# Altium PCB ASCII-v1.2.PcbDoc (part 4 of 4)
Units mil, origin at the board's own origin, x right, y up, seen from the top; angles counter-clockwise.
Board outline 1968.5 x 4921.26 mil, 4 copper layers (Top Layer, Layer 1, Layer 2, Bottom Layer), stack 62.45 mil thick; 189 components, 115 nets, 824 pads, 260 vias.
Unrouted connection lines stored in the file: 139.
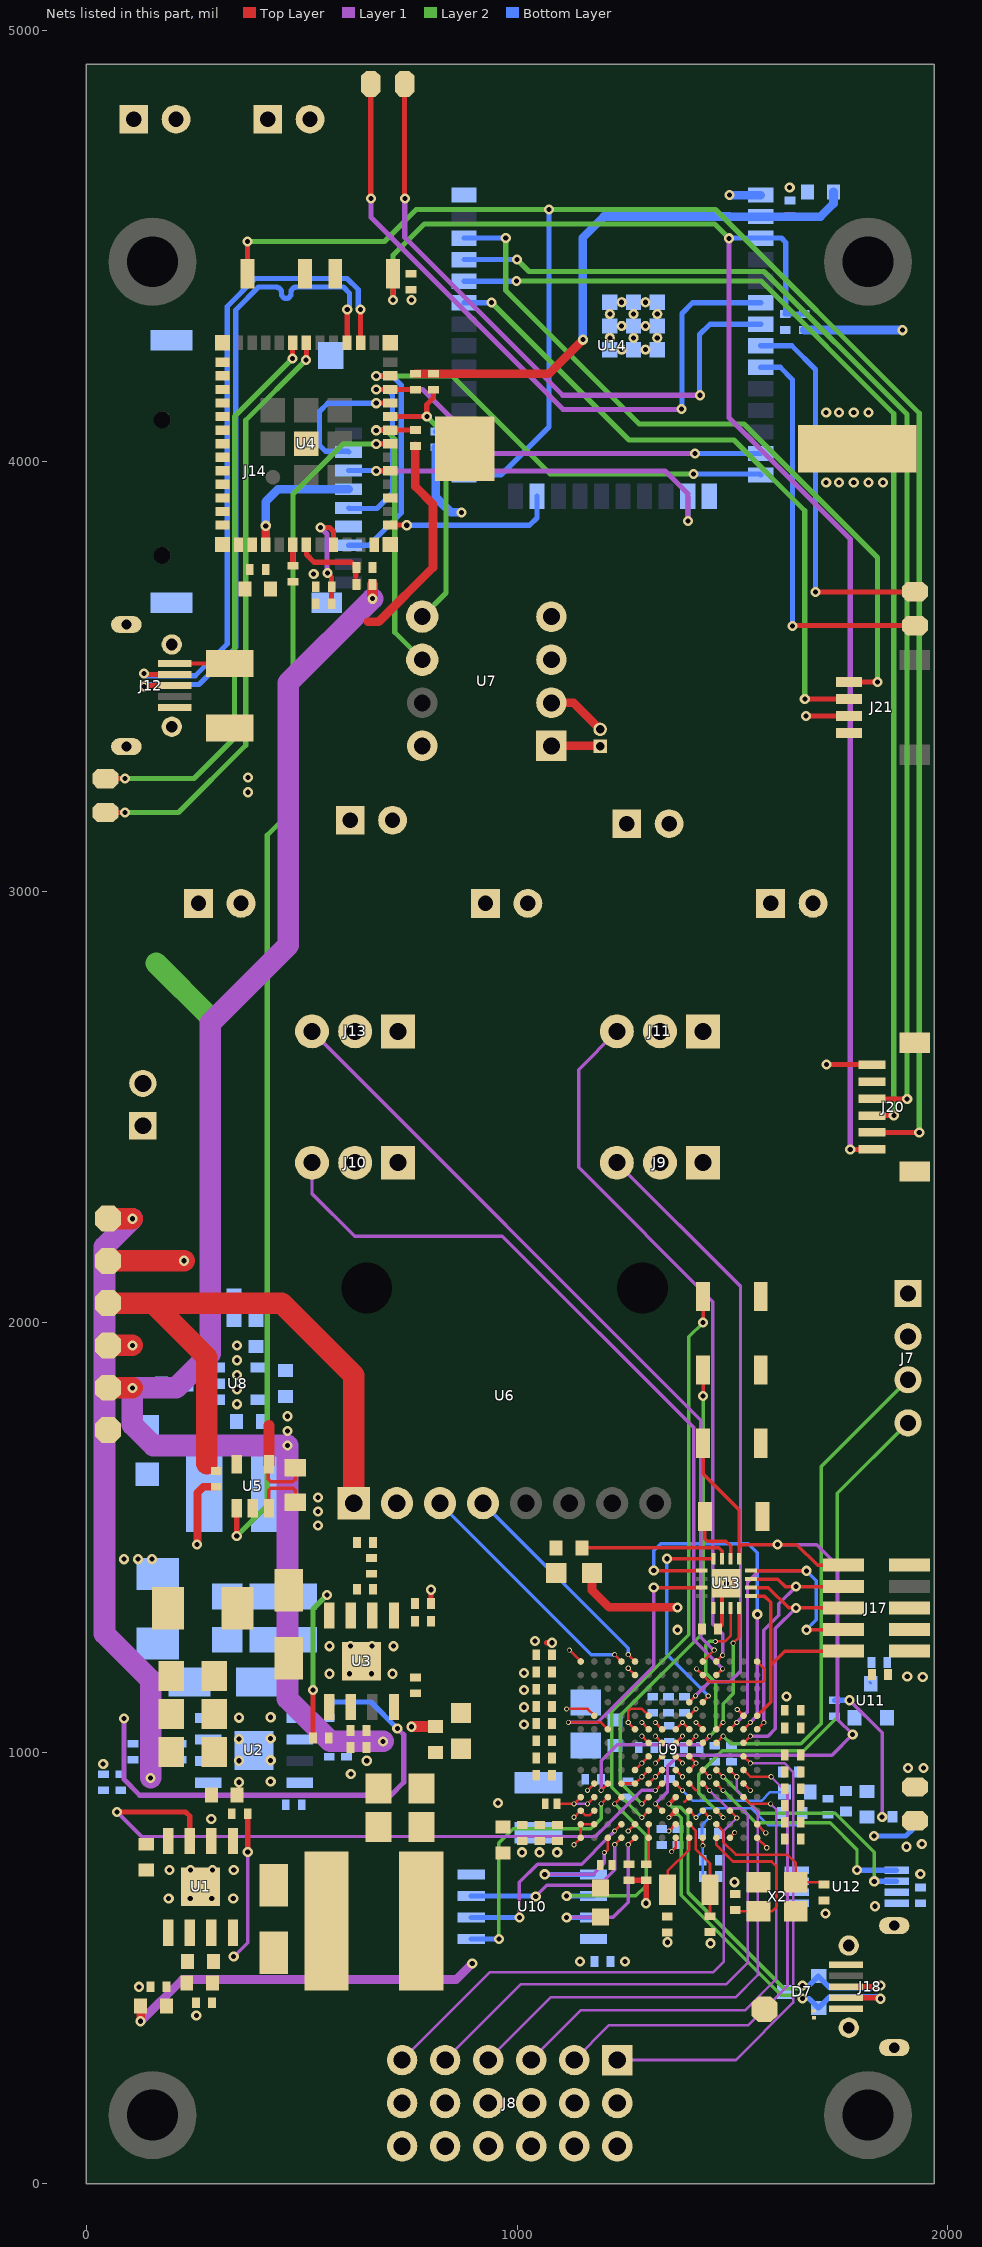
[diagram p4: the nets of this part, all layers, seen from the top]

## Via types
v1: diameter 23.62, hole 11.81, Top Layer to Bottom Layer, tented both sides, 169 vias
v2: diameter 11.81, hole 7.87, Top Layer to Bottom Layer, tented both sides, 78 vias
v3: diameter 23.62, hole 11.81, Top Layer to Bottom Layer, 13 vias

## Nets (pads, with @x,y where several pads share a name; then routed paths per layer and width w, separated by ;. In a path a pad name is that pad's centre, name@x,y a point inside that pad or via, vN(x,y) a via of type N, cw(c..) or ccw(c..) an arc to the next point about the centre after c; other vN are vias at no path point)
3V3: C4.2 C18.1 C19.1 C20.2 C23.2 C37.2 C38.2 C39.2 C40.2 C41.2 C42.2 C43.2 C44.2 C45.2 C46.2 C47.2 C48.2 C49.2 C50.2 C51.2 C52.2 C53.2 C54.2 C55.2 C60.2 C80.2 C81.1 C82.1 D8.1 FB2.1 J5.1 J14.4 J17.1 J19.1 J20.1 J21.2 L3.2 LED2.1 R12.1 R14.2 R15.2 R16.2 R17.2 R27.1 R29.1 R30.1 TP7.1 U4.3 U5.5 U6.1 U9.E6 U9.E9 U9.F5 U9.F10 U9.J6 U9.J10 U9.K4 U9.K5 U9.N14 U9.P12 U10.8 U11.3 U12.8 U13.1 U14.2 | length 5659.3
  Top Layer w6: U9.K4@1242.51,929.02 U9.K5@1274.01,929.02 ; U9.K5@1274.01,929.02 v2(1289.76,944.77) U9.J6@1305.5,960.52 ; U9.F5@1274.01,1055.01 v2(1258.26,1070.76) 1258.5,1071 1258.5,1097.01 1263.75,1102.25 1289.76,1102.25 U9.E6@1305.5,1086.5 ; U9.E9@1399.99,1086.5 v2(1415.74,1102.25) ; v2(1415.74,1070.76) U9.F10@1431.49,1055.01 ; U9.J10@1431.49,960.52 v2(1447.24,944.77) ; U9.P12@1494.48,803.04 1494.48,803.98 v2(1505.5,815.01) ; U9.N14@1557.47,834.54 v2(1577.5,814.5)
  Top Layer w12: 1069,1256 v1(1081,1256) ; v1@1621,1131 v1(1626,1131) ; v1(1671.13,3408.32) J21.2@1779.54,3408.32 ; v1(1718.7,2598.43) J20.1@1827.11,2598.43
  Top Layer w20: v1(126,377) R17.2@126,412 ; U4.3@416.39,3806.23 v1(416.39,3849.74) ; 653,3627 679,3627 805,3753 805,3900 764,3941 R15.2@764,4034.98 ; R14.2@764,4203 R16.2@806,4203 1074.02,4203.02 v1(1153,4282) ; LED2.1@1174,1418 1174,1378 1214,1338 v1(1373,1338)
  Top Layer w50: TP7.1@50,2044.6 106.6,2044.6 ; 107,2044.2 154.8,2044.2 ; 280,1672 280,1919 154.8,2044.2 ; U6.1@621,1580 621,1877 453.8,2044.2 154.8,2044.2
  Layer 1 w20: v1(126,377) 223,474 859,474 v1(896,511)
  Bottom Layer w6: U11.3@1819.5,1164.01 U11.3@1821.5,1162.01
  Bottom Layer w12: v1(1829,807) 1853.99,807.01 1902.5,807.01 1919.24,823.75 D8.1@1919.24,852.02
  Bottom Layer w20: v1(416.39,3849.74) 416.39,3906 444.97,3934.58 J14.4@609.07,3934.58 ; R30.1@811,4032 811,3916 846,3881 v1(871,3881) ; v1(1153,4282) 1153,4519 1202,4568 1493.74,4568 1493.92,4567.82 U14.2@1565.9,4567.82 1704.82,4567.82 1735,4598 C82.1@1735,4625 ; R29.1@1667,4304.5 1893.5,4304.5 1895,4303 v1(1895,4304)
  other v1: 1146,516 1831.5,644.01 956,884 1942.28,1176.29 1906.28,1177.29 1373,1286
3V3_ENABLE: U1.3 U9.K7 | length 1571.5
  Top Layer w6: v2(1321.25,913.28) U9.K7@1337,929.02
  Top Layer w12: v1(71,863) 230.23,863 240.11,853.12 U1.3@240.11,795.42
  Layer 1 w8: v1(71,863) 128,806 1182,806 1210.79,834.79 1289.28,913.28 v2(1321.25,913.28)
5V: C3.2 C15.2 C21.2 C22.2 D3.1 J1.1 J2.1 J4.1 J6.1 J8.2 J8.5 J8.8 J8.11 J8.14 J8.17 J11.1 J13.1 L2.2 R6.2 TP6.1 U1.2 U7.8 | length 1458.4
  Top Layer w12: R6.2@800,1347 v1(800,1379)
  Top Layer w50: TP6.1@50,2241 v1@106.6,2241
  Layer 1 w50: v1(107,2240.6) 42,2175.6 42,1277 149,1170 v1(149,942)
  other v1: 290,847 375,3231 375,3265
8V4: C7.2 C8.2 C9.2 C13.2 C14.2 J3.1 J4.2 J9.1 J10.1 L1.2 R1.2 R2.2 TP5.1 U3.2 | length 232.7
  Top Layer w25: v1@755.34,1061.34 R1.2@811,1061.34
  Top Layer w50: TP5.1@50,2142.8 v1@227,2142.8
  other v1: 614,951 38.97,974.73 755,1061 87,1450 119.5,1450 152,1450 227,2143
12V: C27.2 C28.2 D5.2 J16.1 R21.2 TP3.1 | length 233.4
  Top Layer w50: TP3.1@50,1946.4 v1@106.6,1946.4
  Layer 2 w50: 162,2834 287,2709
  other v1: 107,1946
A10: J13.3 U9.A10 | length 1861.8
  Top Layer w6: U9.A10@1431.76,1212.49 1458,1238.73 v2(1458.01,1239)
  Layer 1 w8: J13.3@523.92,2675.7 1427,1772.62 1427,1268.67 1453.58,1242.09 1453.89,1242.09 1456.98,1239 v2(1458.01,1239)
A11: J11.3 U9.A11 | length 1644.6
  Top Layer w6: U9.A11@1462.98,1212.49 v2(1477.49,1226.99)
  Layer 1 w8: J11.3@1231.91,2675.7 1143,2586.79 1143,2360 1454.81,2048.19 1454.81,1989.88 1454.81,1838.45 1454.81,1819.55 1454.81,1299.17 1477.49,1276.49 v2(1477.49,1226.99)
B11: J10.3 U9.B11 | length 1791.6
  Top Layer w6: U9.B11@1462.98,1180.99 v2(1477.49,1195.5)
  Layer 1 w8: J10.3@523.92,2370.7 523.92,2299.08 623,2200 966,2200 1410.09,1755.91 1410.09,1262.89 1443,1229.98 v2(1477.49,1195.5)
CS: J14.2 U4.21 | length 326.4
  Top Layer w12: v1@672,4134.97 U4.21@705.76,4134.97
  Bottom Layer w12: J14.2@609.07,4021.19 607.26,4023 555,4023 541,4037 541,4115 560.48,4134.48 v1(673,4134.48)
CS1: U4.12 U14.23 | length 398.2
  Top Layer w12: U4.12@705.76,3851.5 743.5,3851.5 v1(744,3851)
  Bottom Layer w12: v1(744,3851) 1029,3851 1046.21,3868.21 U14.23@1046.21,3918.61
CUR_SENSE: U4.18 U5.1 | length 2812.7
  Top Layer w12: v1(349.1,1503.81) U5.1@349.1,1568.32 ; v1@673,4040.48 U4.18@705.76,4040.48
  Layer 2 w12: v1(349.1,1503.81) 420,1574.71 420,3131 479.63,3190.63 479.63,3923.63 595.99,4039.99 v1(673,4039.99)
D9: J9.3 U9.D9 | length 1448.4
  Top Layer w6: U9.D9@1399.99,1118 v2(1414.5,1132.5)
  Layer 1 w8: J9.3@1231.91,2370.7 1518.91,2083.71 1518.91,1189.91 1494,1165 1446.99,1165 v2(1414.5,1132.5)
D10: U9.D10 U13.12 | length 486.7
  Top Layer w6: U9.D10@1431.49,1118 1431.49,1118.88 1444.09,1131.49 v2(1444.09,1132.37)
  Top Layer w8: v1(1348,1451) 1348.09,1451.09 U13.12@1456.47,1451.09
  Bottom Layer w8: v1@1347.69,1451 1347.69,1229.28 1444.09,1132.87 v2(1444.09,1132.37)
EN: C26.2 R27.2 U4.8 | length 250.8
  Top Layer w12: v1(544,3846) 564.34,3846 573.87,3836.47 U4.8@573.87,3806.23 ; v1(559.58,3740.42) 569.5,3730.5 R27.2@569.5,3669
  Layer 1 w12: v1(544,3846) 559,3831 v1@559,3741
EN_1: C83.2 C84.2 J20.6 R29.2 SW6.1 U14.3 | length 3619.4
  Top Layer w12: SW6.1@711.67,4435 711.67,4374.33 v1(712,4374) ; v1(1773.91,2401.57) J20.6@1824.3,2401.57
  Layer 1 w12: v1(1492.15,4517.41) 1492.15,4100.85 1773.91,3819.09 v1(1773.91,2401.57)
  Layer 2 w12: v1(712,4374) 712,4478 785,4551 1458.56,4551 v1(1492.15,4517.41)
  Bottom Layer w12: v1(1492.15,4517.41) 1492.56,4517.82 U14.3@1565.9,4517.82 1614.18,4517.82 1624,4508 1624,4342.5 C83.2@1623,4341.5 R29.2@1667,4341.5
F3: U9.F3 U13.15 | length 644.7
  Top Layer w6: v2(1119.41,1071.01) 1195.02,1071.01 U9.F3@1211.02,1055.01
  Top Layer w8: v1(1317.53,1384.16) U13.15@1428.91,1384.16
  Layer 1 w8: v2(1119.41,1071.01) 1187.5,1071.01 1317.53,1201.03 v1(1317.53,1384.16)
F11: U9.F11 U13.4 | length 303.8
  Top Layer w6: U9.F11@1462.98,1055.01 v2(1478.73,1070.76) ; v2(1502,1255) 1515.53,1268.53 U13.4@1515.53,1336.91
  Layer 2 w8: v2(1478.73,1070.76) 1478.73,1114.73 1502.12,1138.12 1502.12,1254.88 v2(1502,1255)
F13: U9.F13 U13.13 | length 836.8
  Top Layer w6: U9.F13@1525.98,1055.01 v2(1541.72,1070.76)
  Top Layer w8: v1(1317.53,1423.53) U13.13@1428.91,1423.53
  Layer 1 w8: v2(1541.72,1070.76) 1558.22,1087.25 1558.22,1321.78 v1(1558,1322)
  Bottom Layer w8: v1(1317.53,1423.53) 1317.53,1469.53 1334,1486 1537,1486 1558,1465 v1(1558,1322)
G11: J7.3 U9.G11 | length 1159.1
  Top Layer w6: U9.G11@1462.98,1023.51 v2(1478.73,1039.26)
  Layer 2 w8: v2(1478.73,1039.26) 1496.98,1021.01 1659.37,1021.01 1707,1068.64 1707,1665.78 J7.3@1907.92,1866.7
GND: C3.1 C4.1 C5.1 C6.1 C7.1 C8.1 C9.1 C10.1 C11.1 C13.1 C14.1 C15.1 C16.1 C17.1 C18.2 C19.2 C20.1 C21.1 C22.1 C23.1 C24.1 C25.1 C26.1 C27.1 C29.1 C30.1 C31.1 C32.1 C33.1 C34.1 C35.1 C36.1 C37.1 C38.1 C39.1 C40.1 C41.1 C42.1 C43.1 C44.1 C45.1 C46.1 C47.1 C48.1 C49.1 C50.1 C51.1 C52.1 C53.1 C54.1 C55.1 C56.1 C57.1 C58.1 C59.1 C60.1 C61.1 C62.1 C63.1 C64.1 C65.1 C66.1 C67.1 C68.1 C69.1 C70.1 C71.1 C72.2 C73.2 C74.1 C75.1 C76.2 C77.2 C78.1 C79.1 C80.1 C81.2 C82.2 C83.1 C84.1 D1.2 D2.2 D4.2 D6.1 D7.3 J1.2 J2.2 J3.2 J5.2 J6.2 J7.2 J8.3 J8.6 J8.9 J8.12 J8.15 J8.18 J9.2 J10.2 J11.2 J12.5 J12.S1 J12.S2 J12.S3 J12.S4 J13.2 J14.6 J14.MP1 J14.MP2 J14.MP3 J14.MP4 J15.1 J16.2 J17.3 J17.5 J17.9 J18.5 J18.S1 J18.S2 J18.S3 J18.S4 J19.2 J20.2 J20.MP1 J20.MP2 J21.1 LED1.2 R4.1 R5.1 R8.1 R9.1 R13.1 R19.1 R20.1 R22.1 R24.1 SW1.2 SW2.2 SW3.2 SW4.1 SW5.2 SW6.2 TP2.2 TP8.1 U1.7 U1.9 U2.7 U2.9 U3.7 U3.9 U4.1 U4.2 U4.11 U4.14 U4.36 U4.37 U4.38 U4.39 U4.40 U4.41 U4.42 U4.43 U4.44 U4.45 U4.46 U4.47 U4.48 U4.49 U4.50 U4.51 U4.52 U4.53 U5.2 U6.2 U7.4 U8.2 U9.A1 U9.A14 U9.B5 U9.B10 U9.E2 U9.E13 U9.G7 U9.G8 U9.H7 U9.H8 U9.J7 U9.J8 U9.K2 U9.K6 U9.K9 U9.K13 U9.L9 U9.N1 U9.N2 U9.N5 U9.N8 U9.P1 U9.P14 U10.4 U11.1 U12.1 U12.2 U12.3 U12.4 U12.7 U13.2 U13.17 U14.1 U14.15 U14.38 U14.39 U14.39_10 U14.39_11 U14.39_12 U14.39_13 U14.39_14 U14.39_15 U14.39_16 U14.39_17 U14.39_18 U14.39_19 U14.39_20 U14.39_21 U14.40 U14.41 U14.42 U14.43 U14.44 U14.45 U14.46 U14.47 X2.2 X2.4 | length 1224.4
  Top Layer w6: v2(1115.35,1102.25) 1163.77,1102.25 U9.E2@1179.52,1086.5 ; v2(1121.64,1238.88) U9.A1@1148.02,1212.49 ; v2(1132.28,786.98) 1132.28,787.13 1148.02,802.88 U9.P1@1148.02,803.04 U9.N1@1148.02,834.54 U9.N2@1179.52,834.54 ; v2(1163.77,913.28) U9.K2@1179.52,929.02 ; v2(1258.26,818.79) U9.N5@1274.01,834.54 ; v2(1258.26,1196.74) U9.B5@1274.01,1180.99 ; U9.K6@1305.5,929.02 v2(1321.25,944.77) U9.J7@1337,960.52 ; v2(1321.25,976.27) U9.H7@1337,992.02 ; v2(1321.25,1039.26) U9.G7@1337,1023.51 ; v2(1352.75,818.79) U9.N8@1368.5,834.54 ; U9.J8@1368.5,960.52 v2(1384.24,944.77) ; U9.H8@1368.5,992.02 v2(1384.24,976.27) ; U9.G8@1368.5,1023.51 v2(1384.24,1039.26) ; 1388.76,886.28 U9.L9@1399.99,897.53 ; U9.K9@1399.99,929.02 1415.74,913.28 ; v2(1416.98,1195.5) U9.B10@1431.49,1180.99 1447.48,1165 1571,1165 1575,1169 1575,1194.96 U9.A14@1557.47,1212.49 ; v2(1511.47,1101.01) U9.E13@1525.98,1086.5 ; U9.K13@1525.98,929.02 v2(1541.72,913.28) ; U9.P14@1557.47,803.04 v2@1580.3,780.21
  Top Layer w10: C80.1@1466.5,1288 1476.16,1297.66 U13.2@1476.16,1336.91 1476.16,1384.16 v1(1486,1394)
  Top Layer w12: C30.1@1260,704.52 C31.1@1300,704.52 1300,651.5 v1(1299.5,651.01)
  Top Layer w18: v1(257,1484) 258,1485 258,1604.1 271.9,1618 C20.1@301.5,1618
  Bottom Layer w20: v1@1493.92,4617.82 U14.1@1565.9,4617.82
  other v1: 255.28,390.29 122,457 1251,516 1449,558 1349.37,560.37 1716.5,627.01 191.11,662.12 241.11,662.12 291.11,662.12 341.11,662.12 1505,700 1936.5,719.01 193.11,728.12 242.11,728.12 293.11,728.12 342.11,728.12 1011.28,769.29 1052.28,769.29 1093.28,769.29 1904.48,782.28 1940,788.26 354,932 428,934 354,982 651,982 428,983 354,1032 428,1034 1016,1066.21 354,1082 428,1083 1016,1106.14 1016,1146.07 564.81,1184 611,1184 662,1184 711,1184 1016,1186 564.81,1248 613,1248 663,1248 713,1248 1042,1260 350,1946 527.81,3738 755,4374 1493.74,4618 1633.17,4635.09
  other v2: 1580,779.91
  other v3: 350,1810 350,1844 350,1878 350,1912 1717.94,3950.69 1748,3950.69 1782,3950.69 1816,3950.69 1850,3950.69 1717.94,4112.69 1748,4112.69 1782,4112.69 1816,4112.69
H13: J8.1 U9.H13 | length 1129.2
  Top Layer w6: U9.H13@1525.98,992.02 v2(1541.72,976.27)
  Layer 1 w6: J8.1@1233,287 1508,287 1641.19,420.19 1641.19,955.81 1620.73,976.27 v2(1541.72,976.27)
IO0: J20.5 SW5.1 U14.25 | length 4394.4
  Top Layer w12: SW5.1@373.81,4435 373.81,4509.81 v1(374,4510) ; J20.5@1824.3,2440.94 1919.94,2440.94 1920,2441 v1(1934,2441) v1@1939,2441
  Layer 2 w12: v1(374,4510) 692,4510 766,4584 v1(1074,4584) 1461,4584 1934,4111 v1(1934,2441)
  Bottom Layer w12: U14.25@876.92,3967.82 962.56,3967.82 1074,4079.26 v1(1074,4584)
J11: U6.3 U9.A4 | length 573.7
  Top Layer w6: v2(1226.76,1228.24) U9.A4@1242.51,1212.49
  Bottom Layer w8: U6.3@821,1580 1172.76,1228.24 v2(1226.76,1228.24)
J12: J8.10 U9.J12 | length 1210.8
  Top Layer w6: U9.J12@1494.48,960.52 v2(1510.23,944.77)
  Layer 1 w6: J8.10@933,287 1079,433 1508,433 1559,484 1559,864.5 1510.23,913.28 v2(1510.23,944.77)
J13: J8.4 U9.J13 | length 1138.5
  Top Layer w6: U9.J13@1525.98,960.52 1541.72,944.77 v2(1590.15,944.77)
  Layer 1 w6: J8.4@1133,287 1214,368 1537,368 1628.19,459.19 1628.19,906.73 v2(1590.15,944.77)
JTAG_TCK/SWD_CLK: J17.4 U9.F12 U13.8 | length 876.9
  Top Layer w6: U9.F12@1494.48,1055.01 v2(1510.23,1070.76)
  Top Layer w8: U13.8@1543.09,1423.53 v1@1672,1423.53 ; v1@1672,1286.51 J17.4@1757.96,1286.51
  Layer 1 w8: v2(1510.23,1070.76) 1535.19,1095.72 1535.19,1396.19 1562,1423 v1(1672,1423)
  Bottom Layer w8: v1(1672,1286) 1695,1309 1695,1400 v1(1672,1423)
JTAG_TDI: J17.8 U9.F14 U13.7 | length 591.4
  Top Layer w6: U9.F14@1557.47,1055.01 v2@1573.22,1070.76 ; v2(1573.22,1070.6) v2@1573.38,1070.76
  Top Layer w8: U13.7@1543.09,1403.84 1605.16,1403.84 1622.49,1386.51 v1(1648,1386.51) J17.8@1757.96,1386.51
  Layer 1 w8: v2(1573.22,1070.6) 1573.22,1285.22 1607.67,1319.67 1607.67,1346.18 v1(1648,1386.51)
JTAG_TDO: J17.6 U9.G13 U13.6 | length 621.8
  Top Layer w6: U9.G13@1525.98,1023.51 v2(1541.72,1039.26)
  Top Layer w8: U13.6@1543.09,1384.16 1583.84,1384.16 1631,1337 v1(1648,1337) ; v1@1648.25,1337.25 1648.49,1337 J17.6@1757.47,1337
  Layer 1 w8: v2(1541.72,1039.26) 1582.76,1039.26 1600,1056.5 1600,1289 v1(1648,1337)
JTAG_TMS/SWD_IO: J17.2 U9.E14 U13.5 | length 510.9
  Top Layer w8: U13.5@1543.09,1364.47 1574.53,1364.47 1589,1350 1589,1204 ; U9.E14@1557.47,1086.5 1589,1118.03 1589,1204 ; J17.2@1757.96,1236.51 1621.51,1236.51 1589,1204
K3: R24.2 U9.G10 U9.K3 U13.3 | length 773.4
  Top Layer w6: v2(1195.27,913.28) U9.K3@1211.02,929.02 ; U9.G10@1431.49,1023.51 v2(1447.24,1039.26) ; v2(1460.58,1259) 1483,1259 1495.84,1271.84 U13.3@1495.84,1336.91
  Layer 1 w8: v2(1195.27,913.28) 1195.27,981.77 1232.5,1019.01 1426.98,1019.01 v2(1447.24,1039.26)
  Layer 2 w8: v2(1447.24,1039.26) 1461,1053.02 1461,1163 1438.36,1185.64 1438.36,1250.36 1447,1259 v2(1460.58,1259)
  Bottom Layer w6: v2(1195.27,913.28) R24.2@1195.27,939.02 R24.2@1196.5,939.02
K10: J8.13 U9.K10 | length 1274.4
  Top Layer w6: U9.K10@1431.49,929.02 v2(1447.24,913.28)
  Layer 1 w6: J8.13@833,287 1009,463 1486,463 1536,513 1536,856.01 1520,872.01 1488.5,872.01 v2(1447.24,913.28)
K11: U6.4 U9.A5 | length 513.7
  Top Layer w6: v2(1258.26,1228.24) U9.A5@1274.01,1212.49
  Bottom Layer w8: U6.4@921,1580 1258.26,1242.74 v2(1258.26,1228.24)
L13: J8.7 U9.L13 | length 1130
  Top Layer w6: U9.L13@1525.98,897.53 1541.72,881.78 v2(1588.97,881.78) v2@1590.15,881.78
  Layer 1 w6: J8.7@1033,287 1149,403 1530.37,403 1602,474.63 1602,868.75 v2(1588.97,881.78)
M11: J7.4 U9.M11 | length 1274.2
  Top Layer w6: U9.M11@1462.98,866.03 v2(1478.73,850.28)
  Layer 2 w8: v2(1478.73,850.28) 1422,907.02 1422,950 1477,1005 1666,1005 1744,1083 1744,1602.78 J7.4@1907.92,1766.7
M12: J8.16 U9.M12 | length 1210.5
  Top Layer w6: U9.M12@1494.48,866.03 v2@1510.23,850.28 ; v2(1510.23,849.1) v2@1510.34,849.21
  Layer 1 w6: J8.16@733,287 937,491 1456,491 1480,515 1480,818.87 v2(1510.23,849.1)
MISO: J14.7 U4.23 U14.14 | length 1538.9
  Top Layer w12: v1@672,4197.96 U4.23@705.76,4197.96
  Layer 2 w12: v1(673,4197.47) 849.53,4197.47 1077,3970 v1(1410,3970)
  Bottom Layer w12: J14.7@609.07,3804.66 656.5,3804.66 731,3879.16 731,4177 710.53,4197.47 v1(673,4197.47) ; v1(1410,3970) 1563.72,3970 U14.14@1565.9,3967.82
MOSI: J14.3 U4.16 U14.16 | length 964.7
  Top Layer w12: v1@672,3977.49 U4.16@705.76,3977.49
  Layer 1 w12: v1(673,3977) 1344,3977 1396.74,3924.26 v1(1396.74,3861)
  Bottom Layer w12: J14.3@609.07,3977.89 672.11,3977.89 v1(673,3977) ; U14.16@1396.21,3918.61 1396.74,3918.08 v1(1396.74,3861)
NetC1_1: C1.1 D4.1 L3.1 U1.8 | length 345.6
  Top Layer w12: v1(374.61,769.93) C1.1@374.61,859.12
  Layer 1 w8: v1(342,527) 374.61,559.61 v1(374.61,769.93)
NetC1_2: C1.2 U1.1
NetC2_1: C2.1 D1.1 L1.1 U2.8 | length 1133.6
  Layer 1 w12: v1(87,1080) 87,939 124,902 707,902 737,932 737,1042.19 v1(722,1057.19)
  Bottom Layer w12: C2.1@564,1118.5 660.69,1118.5 v1(722,1057.19)
NetC2_2: C2.2 U2.1
NetC10_2: C10.2 R3.1 U2.6
NetC11_2: C11.2 R3.2
NetC12_1: C12.1 D2.1 L2.1 U3.8 | length 345.6
  Top Layer w12: C12.1@526,1035 v1(526,1146.19)
  Layer 2 w12: v1(526,1146.19) 526,1334.19 v1(558.81,1367)
NetC12_2: C12.2 U3.1
NetC16_2: C16.2 R7.2 U3.6
NetC17_2: C17.2 R7.1
NetC24_2: C24.2 R18.2 U1.6
NetC25_2: C25.2 R18.1
NetC28_1: C28.1 R21.1 R22.2 U8.3
NetC30_2: C30.2 C31.2 FB1.2 U9.N6 U9.P6 | length 95.3
  Top Layer w6: C31.2@1300,741.52 1305.5,747.02 U9.P6@1305.5,803.04 U9.N6@1305.5,834.54
NetC32_2: C32.2 C33.2 U9.P8 | length 36
  Top Layer w6: v2(1359,771.02) 1368.5,780.51 U9.P8@1368.5,803.04
NetC34_2: C34.2 C35.2 U9.P10 | length 91.1
  Top Layer w6: U9.P10@1431.49,803.04 v2(1431.5,785.01) v2@1432.59,785.01
  Bottom Layer w6: C35.2@1431.5,713.01 C34.2@1431.5,751.01 v2(1431.5,785.01)
NetC36_2: C36.2 U9.M10 | length 76.9
  Top Layer w6: U9.M10@1431.49,866.03 v2(1447.24,850.28)
  Bottom Layer w6: C36.2@1429.5,803.03 C36.2@1429.5,813.01 1429.5,832.55 v2(1447.24,850.28)
NetC56_2: C56.2 C57.2 C58.2 C59.2 FB2.2 U9.L1 U9.L2 | length 115.4
  Top Layer w6: FB2.2@1093,882.02 1093.24,881.78 v2(1132.28,881.78) U9.L1@1148.02,897.53 ; v2(1163.77,881.78) U9.L2@1179.52,897.53
  Layer 1 w6: v2(1132.28,881.78) v2(1163.77,881.78)
NetC61_2: C61.2 C62.2 C63.2 C64.2 C65.2 C66.2 C67.2 C68.2 C69.2 C70.2 C71.2 C74.2 L5.1 U9.F6 U9.F7 U9.F8 U9.F9 U9.G6 U9.G9 U9.H6 U9.H9 U9.J5 U9.J9 | length 222.7
  Top Layer w6: U9.J5@1274.01,960.52 v2(1289.76,976.27) U9.H6@1305.5,992.02 ; v2(1289.76,1039.26) U9.G6@1305.5,1023.51 ; v2(1289.76,1070.76) U9.F6@1305.5,1055.01 ; v2(1321.25,1070.76) U9.F7@1337,1055.01 ; U9.F8@1368.5,1055.01 v2(1384.24,1070.76) U9.F9@1399.99,1055.01 ; U9.J9@1399.99,960.52 v2(1415.74,976.27) U9.H9@1399.99,992.02 ; U9.G9@1399.99,1023.51 v2(1415.74,1039.26)
NetC72_1: C72.1 U9.N11 X2.1 | length 346.7
  Top Layer w6: U9.N11@1462.98,834.54 1478.5,819.02 1478.5,793.64 1508.13,764.01 1627.52,764.01 1647.31,744.22 X2.1@1647.31,699.48 C72.1@1712.71,699.48
NetC73_1: C73.1 U9.P11 X2.3 | length 371.5
  Top Layer w6: U9.P11@1462.98,803.04 1462.5,803.52 1462.5,787.01 1501.5,748.01 1591.5,748.01 1601.5,738.01 1601.5,640.92 1593.13,632.55 X2.3@1560.69,632.55 C73.1@1507,632.55
NetC76_1: C76.1 U9.P9 X3.2 | length 141.8
  Top Layer w6: X3.2@1349.79,682.02 1349.79,726.06 1399.99,776.27 U9.P9@1399.99,803.04
NetC77_1: C77.1 U9.N9 X3.1 | length 233.5
  Top Layer w6: U9.N9@1399.99,834.54 1415.5,819.02 1415.5,776.02 1448.21,743.31 X3.1@1448.21,682.02 C77.1@1448.21,621.02
NetC78_2: C78.2 C79.2 D10.1 U9.K8 | length 277.4
  Top Layer w6: U9.K8@1368.5,929.02 v2(1384.24,913.28)
  Bottom Layer w6: v2(1384.24,913.28) 1408.51,889.01 1567.74,889.01 1587.75,909.02 C78.2@1621,909.02
NetD3_2: D3.2 J12.1 | length 127.8
  Top Layer w10: J12.1@205.2,3529.93 332.93,3529.93 D3.2@333,3530
NetD5_1: D5.1 L4.2 U8.1
NetF1_2: F1.2 FB1.1
NetJ15_2: J15.2 U7.3
NetL5_2: L5.2 U9.M1 U9.M2 | length 62.7
  Top Layer w6: v2(1132.28,850.69) 1132.48,850.69 1147.82,866.03 U9.M1@1148.02,866.03 1159.06,855 1168.49,855 U9.M2@1179.52,866.03
NetLED1_1: LED1.1 R1.1
NetLED2_2: LED2.2 R26.2
NetR2_1: R2.1 R5.2 U2.5
NetR4_2: R4.2 U2.4
NetR6_1: R6.1 R9.2 U3.5
NetR8_2: R8.2 U3.4
NetR11_2: R11.2 R13.2 U4.6 | length 172.4
  Top Layer w12: U4.6@510.88,3806.23 510.88,3783.12 528.77,3765.23 614.88,3765.23 625.44,3754.67 625.44,3731.73
NetR12_2: R12.2 U4.5 | length 49.7
  Top Layer w12: U4.5@479.38,3806.23 479.38,3757.23 R12.2@479.88,3756.73
NetR17_1: R17.1 R20.2 U1.5
NetR19_2: R19.2 U1.4
NetR26_1: R26.1 U13.11 | length 355.1
  Top Layer w8: R26.1@1150.66,1476 R26.1@1151.66,1477 ; R26.1@1150.66,1477 R26.1@1151.66,1477 ; R26.1@1156.66,1482 R26.1@1151.66,1477 ; U13.11@1476.16,1451.09 1476.16,1468.84 1468,1477 R26.1@1151.66,1477
NetR28_1: R28.1 U8.4
NetR30_2: R30.2 U14.27 | length 66.4
  Bottom Layer w12: R30.2@811,4069 812.18,4067.82 U14.27@876.92,4067.82
NetSW4_2: SW4.2 U13.10 | length 147.9
  Top Layer w8: SW4.2@1436.07,1549 1436.07,1506.07 1436.07,1497.93 1442,1492 1485,1492 1495.84,1481.16 U13.10@1495.84,1451.09
NetU7_1: U7.1 X1.1 | length 113
  Top Layer w20: U7.1@1079.89,3338.75 X1.1@1192.89,3338.75
NetU7_2: U7.2 X1.2 | length 138.5
  Top Layer w20: U7.2@1079.89,3438.75 1131.27,3438.75 X1.2@1192.89,3377.13
NetU9_J11: U9.J11 U12.6 | length 565.1
  Top Layer w6: U9.J11@1462.98,960.52 v2(1478.73,944.77)
  Layer 2 w8: v2(1478.73,944.77) 1563.5,860.01 1738.99,860.01 1829.5,769.5 v1(1829.5,702.01)
  Bottom Layer w12: v1(1829.5,702.01) U12.6@1881.5,702.01
NetU9_K11: U9.K11 U12.5 | length 529.8
  Top Layer w6: U9.K11@1462.98,929.02 v2(1478.73,913.28)
  Layer 2 w8: v2(1478.73,913.28) 1554.27,837.74 1727.26,837.74 1789.5,775.5 v1(1789.5,728.01)
  Bottom Layer w6: v1(1789.5,728.01) v1@1789.91,727.6
  Bottom Layer w12: v1@1789.91,727.6 U12.5@1881.5,727.6
NetU9_L3: U9.L3 U10.1 | length 604.5
  Top Layer w6: v2(1195.27,881.78) U9.L3@1211.02,897.53
  Layer 2 w8: v1(958,568) 958,791 991,824 1171.36,824 1195.27,847.9 v2(1195.27,881.78)
  Bottom Layer w12: U10.1@893.5,568.01 v1(958,568)
NetU9_L4: U9.L4 U10.6 | length 499
  Top Layer w6: v2(1226.76,881.78) U9.L4@1242.51,897.53
  Layer 2 w8: v1(1115.36,668.01) 1275.99,668.01 1300,692.02 1300,808.54 v2(1226.76,881.78)
  Bottom Layer w12: v1(1115.36,668.01) U10.6@1177.36,668.01
NetU9_N4: U9.N4 U10.2 | length 486.7
  Top Layer w6: v2(1226.76,818.79) U9.N4@1242.51,834.54
  Layer 1 w8: v1(1005.5,618.01) 1005.5,700.01 1047.5,742 1149.98,742 1209.98,802 v2(1226.76,818.79)
  Bottom Layer w12: U10.2@893.5,618.01 v1(1005.5,618.01)
NetU9_P3: U9.P3 U10.5 | length 325.1
  Top Layer w6: v2(1203,769) 1204,769 1211.02,776.02 U9.P3@1211.02,803.04
  Layer 1 w8: v1(1064.33,718.18) 1176.68,718.18 1203,744.5 v2(1203,769)
  Bottom Layer w12: v1(1064.33,718.18) 1064.5,718.01 U10.5@1177.36,718.01
NetU9_P4: U9.P4 U10.3 | length 439.8
  Top Layer w6: v2(1226.92,787.29) 1226.92,787.37 U9.P4@1242.51,803.04 U9.P4@1242.51,803.04
  Layer 1 w8: v1(1043.5,667.01) 1069.5,693.01 1190.5,693.01 1226.76,729.27 1226.76,787.13 v2(1226.92,787.29)
  Bottom Layer w12: U10.3@893.5,668.01 1042.5,668.01 v1(1043.5,667.01)
NetU9_P5: U9.P5 U10.7 | length 375.5
  Top Layer w6: v2(1258.26,787.29) U9.P5@1274.01,803.04
  Layer 1 w8: v1(1115.36,618.01) 1222.5,618.01 1258.26,653.76 v2(1258.26,787.29)
  Bottom Layer w12: v1(1115.36,618.01) U10.7@1177.36,618.01
ON/OFF: SW1.1 U9.M6 | length 1348.6
  Top Layer w6: v2(1289.76,850.28) U9.M6@1305.5,866.03
  Top Layer w8: v1@1432.07,1999.4 SW1.1@1432.07,2060
  Layer 2 w8: v2(1289.76,850.28) 1220,920.04 1220,1095.28 1399,1274.28 1399,1966.33 v1(1432,1999.33)
RST_MCU: J17.10 R23.2 SW3.1 U9.M7 U11.2 U13.9 | length 1717.2
  Top Layer w6: v2(1321.25,881.78) U9.M7@1337,866.03
  Top Layer w8: SW3.1@1432.07,1719.33 1432.07,1647.93 1515.53,1564.47 1515.53,1476.53 ; U13.9@1515.53,1451.09 1515.53,1476.53 ; J17.10@1757.96,1436.51 1757.45,1436 1698,1436 1650,1484 v1(1604.72,1484) 1523,1484 1515.53,1476.53
  Layer 1 w8: v2(1321.25,881.78) 1349.5,910.03 1349.5,969.01 1375.51,995.02 1731.51,995.02 v1(1779.5,1043.01) 1745,1077.51 1745,1435 1696,1484 v1(1604.72,1484)
RX0: TP1.1 U4.30 | length 1383.7
  Top Layer w12: TP1.1@44,3184 v1(90,3184) ; v1(509.94,4234.94) 510.88,4235.88 U4.30@510.88,4274.73
  Layer 2 w12: v1(90,3184) 214,3184 370,3340 370,4095 v1(509.94,4234.94)
RXD0: J20.4 U14.34 | length 2806.1
  Top Layer w12: J20.4@1824.61,2480 v1(1875,2480)
  Layer 2 w12: v1(998.55,4418) 1567,4418 1875,4110 v1(1875,2480)
  Bottom Layer w12: U14.34@876.92,4417.82 997.82,4417.82 998,4418 v1(998.55,4418)
RXD1: TP11.2 U14.6 | length 1631.4
  Top Layer w12: v1@660.26,4609.5 TP11.2@660.26,4876
  Layer 1 w12: v1(660.76,4609.5) 660.76,4566.24 1106,4121 1107,4120 v1@1382,4120
  Bottom Layer w12: v1(1382,4121) 1383,4122 1383,4343 1407.82,4367.82 U14.6@1565.9,4367.82
RXD2: TP10.2 U14.8 | length 898
  Top Layer w12: v1(1693.13,3696) 1693.5,3696.37 1923.63,3696.37 TP10.2@1924,3696.74
  Bottom Layer w12: U14.8@1565.9,4267.82 1638.18,4267.82 1693.13,4212.87 v1(1693.13,3696)
S+: J7.1 R10.2 U5.3 | length 134.1
  Top Layer w8: U5.3@423.9,1568.32 423.9,1609.81 428.59,1614.5 480.5,1614.5 485.5,1609.5 R10.2@485.5,1582.5
  other v1: 538,1528 538,1560.5 538,1593
S-: C5.2 C6.2 C29.2 L4.1 R10.1 R11.1 R28.2 TP4.1 U2.2 U5.4 U8.5 | length 3749.6
  Top Layer w8: U5.4@423.9,1670.68 422.5,1669.28 422.5,1635.5 428.5,1629.5 479.5,1629.5 485.5,1635.5 R10.1@485.5,1662.5
  Top Layer w25: U5.4@423.9,1670.68 423.9,1760.29 ; v1(664.38,3680.54) R11.1@664.38,3713.23
  Top Layer w50: TP4.1@50,1848.2 v1@106.6,1848.2
  Layer 1 w50: v1(664.38,3680.54) 469,3485.16 469,2876 288,2695 288,1927 208.8,1847.8 v1(107,1847.8) 107,1762 155,1714 v1(467,1714) 467,1126 566,1027 v1(689,1027)
  other v1: 467,1748 467,1782
SCL: R15.1 U4.19 U7.6 | length 681.2
  Top Layer w12: v1@673,4071.98 U4.19@705.76,4071.98 R15.1@764,4071.98
  Layer 2 w12: v1(673,4071.49) 695.51,4071.49 716,4051 716,3602.64 U7.6@779.89,3538.75
SCL_1: J21.4 U14.36 | length 1677.9
  Top Layer w12: J21.4@1776.72,3487.06 1836.94,3487.06 v1(1837,3487)
  Layer 2 w12: v1(973.74,4518) 973.74,4396.26 1284,4086 1527.09,4086 1837,3776.09 v1(1837,3487)
  Bottom Layer w12: U14.36@876.92,4517.82 v1@963.56,4517.82
SCLK: J14.5 R14.1 U4.22 U14.13 | length 1425.5
  Top Layer w12: v1@672,4166.46 U4.22@705.76,4166.46 R14.1@754.88,4166.46
  Layer 1 w12: v1(673,4165.97) 780.85,4165.97 928.82,4018 v1(1413,4018)
  Bottom Layer w12: J14.5@609.07,3891.27 610.34,3890 675,3890 711,3926 711,4154 699.03,4165.97 v1(673,4165.97) ; v1(1413,4018) 1413.18,4017.82 U14.13@1565.9,4017.82
SDA: R16.1 U4.20 U7.5 | length 659.7
  Top Layer w12: U4.20@705.76,4103.47 v1(790.47,4103.47) 790.47,4131.41 806,4146.94 R16.1@806,4166
  Layer 2 w12: U7.5@779.89,3638.75 835,3693.86 835,4058.94 v1(790.47,4103.47)
SDA_1: J21.3 U14.33 | length 1537.7
  Top Layer w12: v1(1668.32,3447.69) J21.3@1776.72,3447.69
  Layer 2 w12: v1(940.74,4368) 1259.74,4049 1504,4049 1668.32,3884.69 1668.32,3672.8 v1(1668.32,3447.69)
  Bottom Layer w12: U14.33@876.92,4367.82 938.92,4367.82 v1@940.74,4366
TX0: TP1.2 U4.31 | length 1312.3
  Top Layer w12: TP1.2@44,3262.74 v1(90,3262.74) ; v1@478.49,4238.54 478.49,4273.83 U4.31@479.39,4274.73
  Layer 2 w12: v1(90,3262.74) 249.74,3262.74 344,3357 344,4103.54 v1@478.46,4238
  other v1: 478.46,4238.54
TXD0: J20.3 U14.35 | length 2848.3
  Top Layer w12: J20.3@1824.98,2519 v1(1906,2519)
  Layer 2 w12: v1(1000,4468) 1027.81,4440.19 1573.81,4440.19 1906,4108 v1(1906,2519)
  Bottom Layer w12: U14.35@876.92,4467.82 999.82,4467.82 v1(1000,4468)
TXD1: TP11.1 U14.7 | length 1486.6
  Top Layer w12: v1@739,4609.5 TP11.1@739,4876
  Layer 1 w12: v1@739.25,4609.5 739.25,4519.75 1106,4153 v1@1424.5,4153
  Bottom Layer w12: v1(1425,4153) 1424,4154 1424,4294 1447.82,4317.82 U14.7@1565.9,4317.82
  other v1: 739.5,4609.5
TXD2: TP10.1 U14.9 | length 943.9
  Top Layer w12: v1@1639,3618 v1(1640,3617) 1641,3618 TP10.1@1924,3618
  Bottom Layer w12: U14.9@1565.9,4217.82 1611.18,4217.82 1640,4189 v1(1640,3617)
USB1_D_N: D7.2 J18.2 U9.M8 | length 905.5
  Top Layer w10: v2(1352.75,850.28) U9.M8@1368.5,866.03
  Top Layer w12: J18.2@1763.6,431.68 1844,431.68 v1(1844,429.17)
  Layer 2 w8: v2(1352.75,850.28) 1360.5,858.03 1373,858.03 1381,850.03 1381,669.37 1613.37,437 1655.69,437 v1(1663,429.69)
  Bottom Layer w12: v1(1663,429.69) 1678.28,429.69 D7.2@1700.37,407.6 1700.37,407.85 1727,434.48 1838.69,434.48 v1(1844,429.17)
USB1_D_P: D7.1 J18.3 U9.L8 | length 906.6
  Top Layer w10: v2(1352.75,881.78) U9.L8@1368.5,897.53
  Top Layer w12: J18.3@1763.6,457.27 1844,457.27 v1(1844,459.79)
  Layer 2 w8: v2(1352.75,881.78) 1360.5,874.03 1379.63,874.03 1397,856.66 1397,676 1620,453 1655.69,453 v1(1663,460.31)
  Bottom Layer w12: v1(1663,460.31) 1678.28,460.31 D7.1@1700.37,482.4 1700.37,481.11 1727,454.48 1838.69,454.48 v1(1844,459.79)
USB_D_N: J12.2 U4.26 | length 1549.3
  Top Layer w12: v1(134,3506.86) 136.52,3504.34 J12.2@205.2,3504.34 ; v1(636.43,4352) 636.43,4275.17 U4.26@636.87,4274.73
  Bottom Layer w12: v1(134,3506.86) 139.31,3501.55 253,3501.55 327,3575.55 327,4359.28 391.72,4424 605.4,4424 631.12,4398.28 631.12,4357.31 v1(636.43,4352)
USB_D_P: J12.3 U4.27 | length 1549.1
  Top Layer w12: v1(134,3476.23) 136.52,3478.75 J12.3@205.2,3478.75 ; U4.27@605.37,4274.73 605.81,4275.17 v1(605.81,4352)
  Bottom Layer w12: v1(134,3476.23) 139.31,3481.55 261.28,3481.55 347,3567.26 347,4351 400,4404 413,4404 441,4404 cw(c441,4392) 453,4392 453,4388.68 ccw(c464,4388.68) 475,4388.68 475,4392 cw(c487,4392) 487,4404 531.03,4404 597.12,4404 611.12,4390 611.12,4357.31 v1(605.81,4352)
USB_VBUS: D6.2 F1.1 J18.1 TP9.1
V_RTC: D9.1 R25.1 TP2.1
  other v1: 1908,965 1944,965
VDD_SNVS: C75.2 D8.2 D9.2 D10.2 R23.1 R25.2 U9.M9 | length 620.1
  Top Layer w6: U9.M9@1399.99,866.03 v2(1415.74,850.28)
  Layer 1 w8: v1(1772,1122.51) 1848,1046.51 v1(1848,851)
  Bottom Layer w6: v2(1415.74,850.28) 1437.46,872.01 1543.5,872.01 1583.5,832.01 1650.5,832.01
  Bottom Layer w12: R23.1@1737.5,1122.51 v1(1772,1122.51)
WAKE_UP: SW2.1 U9.L6 | length 1129.4
  Top Layer w6: v2(1289.76,881.78) U9.L6@1305.5,897.53
  Top Layer w8: v1(1432,1829) 1432.07,1829.07 SW2.1@1432.07,1889.67
  Layer 2 w8: v2(1289.76,881.78) 1240,931.54 1240,1087 1432,1279 v1@1432,1828.05
pads on no net: J12.4 J14. J14.1 J14.8 J14.9 J17.7 J18.4 J21.MP1 J21.MP2 U2.3 U3.3 U4.4 U4.7 U4.9 U4.10 U4.13 U4.15 U4.17 U4.24 U4.25 U4.28 U4.29 U4.32 U4.33 U4.34 U4.35 U4.54 U4.55 U4.56 U4.57 U4.58 U4.59 U4.60 U4.61 U6. U6.5 U6.6 U6.7 U6.8 U7.7 U9.A2 U9.A3 U9.A6 U9.A7 U9.A8 U9.A9 U9.A12 U9.A13 U9.B1 U9.B2 U9.B3 U9.B4 U9.B6 U9.B7 U9.B8 U9.B9 U9.B12 U9.B13 U9.B14 U9.C1 U9.C2 U9.C3 U9.C4 U9.C5 U9.C6 U9.C7 U9.C8 U9.C9 U9.C10 U9.C11 U9.C12 U9.C13 U9.C14 U9.D1 U9.D2 U9.D3 U9.D4 U9.D5 U9.D6 U9.D7 U9.D8 U9.D11 U9.D12 U9.D13 U9.D14 U9.E1 U9.E3 U9.E4 U9.E5 U9.E7 U9.E8 U9.E10 U9.E11 U9.E12 U9.F1 U9.F2 U9.F4 U9.G1 U9.G2 U9.G3 U9.G4 U9.G5 U9.G12 U9.G14 U9.H1 U9.H2 U9.H3 U9.H4 U9.H5 U9.H10 U9.H11 U9.H12 U9.H14 U9.J1 U9.J2 U9.J3 U9.J4 U9.J14 U9.K1 U9.K12 U9.K14 U9.L5 U9.L7 U9.L10 U9.L11 U9.L12 U9.L14 U9.M3 U9.M4 U9.M5 U9.M13 U9.M14 U9.N3 U9.N7 U9.N10 U9.N12 U9.N13 U9.P2 U9.P7 U9.P13 U13.14 U13.16 U14.4 U14.5 U14.10 U14.11 U14.12 U14.17 U14.18 U14.19 U14.20 U14.21 U14.22 U14.24 U14.26 U14.28 U14.29 U14.30 U14.31 U14.32 U14.37

## Polygon pours and split planes (outlines as drawn)
3V3 on Top Layer "3V3_L01_P034" (solid, remove dead copper, pour order 34): 498,3741.48 498,3683 543,3683 543,3643 661.79,3643 661.79,3033 406,3033 406,3823 430,3823 430,3741.48
GND on Top Layer "GND_L01_P032" (solid, remove dead copper, pour order 32): 0,0 0,4921.26 1968.5,4921.26 1968.5,0
3V3 on Top Layer "3V3_L01_P027" (solid, remove dead copper, pour order 27): 1461,1351 1461,1317 1438,1317 1438,1274 1361,1274 1361,1351
USB_VBUS on Top Layer "USB_VBUS_L01_P023" (solid, pour order 23): 1235,415 1235,641 1168,641 1168,366 1612,366 1612,395 1803,395 1803,415 1703.37,415
5V on Top Layer "5V_L01_P018" (solid, remove dead copper, pour order 18): 418,2482 418,2198 11,2198 11,2503 202,2503 202,2805.5 744,2805.5 744,3071 744,3383 1025,3383 1025,3071 1638.21,3071 1638.21,2482
GND on Bottom Layer "GND_L04_P022" (solid, remove dead copper, pour order 22): 0,0 0,4921.26 1968.5,4921.26 1968.5,0
3V3 on Bottom Layer "3V3_L04_P025" (solid, remove dead copper, pour order 25): 1797,2554 1497,2554 1497,3032 500,3032 500,3260.36 1390,3260.36 1390,3422 1797,3422
S+ on Bottom Layer "S+_L04_P024" (solid, remove dead copper, pour order 24): 506,1994 506,1514 569,1514 569,1694 1844,1694 1844,2027 1959,2027 1959,2222 1683,2222 1683,1994
3V3 on Bottom Layer "3V3_L04_P021" (solid, remove dead copper, pour order 21): 1196.5,491 1196.5,551 1223,551 1223,589 1111,589 1111,491
12V on Bottom Layer "12V_L04_P020" (solid, remove dead copper, pour order 20): 10.19,2091 363,2091 363,2029 203,2029 203,1706 10.19,1706
8V4 on Bottom Layer "8V4_L04_P019" (solid, remove dead copper, pour order 19): 1640,2464 317,2464 317,3106 9,3106 9,2102 1640,2102
NetC61_2 on Bottom Layer "NETC61_2_L04_P003" (solid, remove dead copper, pour order 3): 1279.5,1048.01 1279.5,1111.01 1436.5,1111.01 1436.5,996.01 1520.87,996.01 1520.87,962.01 1407.87,962.01 1407.87,1019.01 1406.5,1019.01 1406.5,1048.01 1294.5,1048.01 1294.5,964.01 1376.37,964.01 1376.37,921.15 1235.5,921.15 1235.5,973.01 1108.5,973.01 1108.5,904.01 985.5,904.01 985.5,1048.01
3V3 on Layer 2 "3V3_L03_P033" (solid, remove dead copper, pour order 33): 311,350 1968.5,350 1968.5,4631 311,4631
5V on Layer 2 "5V_L03_P031" (solid, remove dead copper, pour order 31): 589,4911.06 589,4537 849,4537 849,3212 320,3212 320,4911.06
5V on Layer 2 "5V_L03_P029" (solid, remove dead copper, pour order 29): 782.11,885 782.11,1463 836,1463 836,338 1955,338 1955,19 0,19 0,885
12V on Layer 2 "12V_L03_P030" (solid, remove dead copper, pour order 30): 164,1908 164,2204 312,2204 312,4913 11,4913 11,1908
8V4 on Layer 2 "8V4_L03_P026" (solid, remove dead copper, pour order 26): 0,1464 0,1894 175,1894 175,2190 302,2190 302,1464 772,1464 774,1467 774,898 0,898
GND on Layer 1 "GND_L02_P035" (solid, pour order 35): 0,0 0,4921.26 1968.5,4921.26 1968.5,0

## Other copper
Top Layer:
  rectangle net GND: 515,3692 540,3749
  rectangle net EN_1: 695,4360 729,4488
  rectangle net EN_1: 695,4419 776,4488
  rectangle net GND: 1193,4239 1341,4394
  rectangle net 5V: 277,3218 390,3415
  region net NetR8_2: 700,1157 700,1076 730,1076 730,1157
  rectangle net S+: 411,1515 551,1604
  rectangle net S-: 411,1642 518,1843
  region net 3V3: 392.42,1695.29 254,1695.29 254,1637.5 392.42,1637.5
  rectangle net NetC1_1: 328,442.12 602,614
  rectangle net NetLED1_1: 787,985 895,1033
  rectangle net 5V: 120,888 305.11,920.12
  rectangle net NetJ15_2: 905.51,3496.94 1029.51,4105
  rectangle net NetJ15_2: 810,3930 1032,4112
  region net NetR6_1: 775,1286 775,1365 695,1365 695,1286
  region net NetC16_2: 680,1286 680,1425 645,1425 645,1286
  region net NetC12_2: 577,1019 577,1138 548,1138 548,1019
  rectangle net 8V4: 602,937 626,1140
  region net NetC12_1: 577,1287 577,1485 301,1485 301,1287
  region net NetC17_2: 680,1444 680,1505 645,1505 645,1444
  rectangle net NetR8_2: 700,1127 780,1157
  region net GND: 784,1165 784,1272 418,1272 418,1165
  region net 5V: 242,888 242,1388 120,1388 120,888
  region net NetC73_1: 1588.5,656.01 1492.5,656.01 1492.5,608.01 1588.5,608.01
  region net NetC72_1: 1729.5,726.01 1618.5,726.01 1618.5,675.01 1729.5,675.01
  region net NetC30_2: 1314.5,758.02 1211.5,758.02 1211.5,726.01 1314.5,726.01
  region net NetF1_2: 1201.5,752.01 1171.5,752.01 1171.5,666.01 1201.5,666.01
  region net NetF1_2: 1214.5,706.01 1171.5,706.01 1171.5,666.01 1214.5,666.01
  region net NetC77_1: 1468.5,718.01 1427.5,718.01 1427.5,611.01 1468.5,611.01
  region net NetC76_1: 1369.28,718 1328.28,718 1328.28,611 1369.28,611
  region net 3V3: 1075.5,923.01 830,923.01 830,863.01 1075.5,863.01
  region net NetC56_2: 1106.5,845.01 943.5,845.01 943.5,812.01 1106.5,812.01
  region net NetC56_2: 1106.5,900.02 1083.5,900.02 1083.5,812.01 1106.5,812.01
  region net 3V3: 1097.5,1268 1062.5,1268 1062.5,908.01 1097.5,908.01
  region net 3V3: 1637.5,1143 1603.5,1143 1603.5,777.01 1637.5,777.01
  region net 3V3: 914,958 727.11,958 727.11,437.12 914,437.12
  region net GND: 117.11,751.12 117.11,630.12 473.11,630.12 473.11,751.12
  region net NetC25_2: 315,486 275,486 275,404 315,404
  region net NetC1_1: 612.11,782.12 492.11,782.12 492.11,442.12 612.11,442.12
  region net NetC1_2: 352.11,872.12 322.11,872.12 322.11,762.12 352.11,762.12
  region net 5V: 305.11,920.12 274.11,920.12 274.11,764.12 305.11,764.12
  region net NetC24_2: 257.11,617.12 212.11,617.12 212.11,447.12 257.11,447.12
  region net NetR17_1: 202.11,617.12 167.11,617.12 167.11,392 202.11,392
  region net NetR19_2: 202.11,832.12 117.11,832.12 117.11,762.12 202.11,762.12
  rectangle net GND: 294.88,3689.23 395.88,3825.23
  rectangle net NetR11_2: 613.88,3697.23 637,3766.23
  rectangle net GND: 655.88,3740.23 675.88,3825.23
  rectangle net GND: 655.88,3783.23 760.88,3825.23
  rectangle net GND: 1888,770.99 1958,869.26
  region net V_RTC: 1960,981 1890,981 1890,894 1960,894
  region net NetJ15_2: 1124.97,3496.05 1124.97,3581.05 916.97,3581.05 916.97,3496.05
  region net 3V3: 1964.5,1251.01 1851.5,1251.01 1851.5,1161 1964.5,1161
  region net NetLED2_2: 1116.66,1388 1116.66,1495 1065.66,1495 1065.66,1388
  pour cut-out: 394,1440 394,1233 150,1233 150,1440
  pour cut-out: 505.93,777.01 505.93,442.12 867,442.12 867,777.01
  pour cut-out: 769,4921.26 1971,4921.26 1971,4651 769,4651
Layer 1:
  rectangle net S-: 441,1686.5 492,1803.5
  pour cut-out: 572,4921.26 1971,4921.26 1971,4651 572,4651
Layer 2:
  pour cut-out: 572,4921.26 1971,4921.26 1971,4651 572,4651
Bottom Layer:
  rectangle net NetD5_1: 112,1512 322,1676
  rectangle net NetD5_1: 229,1512 322,1832
  rectangle net NetR2_1: 254,897 313,942
  rectangle net GND: 1194.74,4239 1345.74,4390
  rectangle net 3V3: 1612,1116 1683,1254.01
  rectangle net 5V: 354,3216 475,3378
  rectangle net 5V: 354,3286 954,3378
  rectangle net NetC2_1: 240,1058 321,1212
  region net S-: 380,1844 380,1514 488,1514 488,1844
  region net GND: 332,1964 332,1749 366,1749 366,1964
  region net NetR28_1: 378,1911 378,1872 481,1872 481,1911
  region net GND: 332,1964 332,1924 481,1924 481,1964
  region net NetC28_1: 279,2020 279,1978 411,1978 411,2020
  region net GND: 219,1874 219,1840 357,1840 357,1874
  region net NetC28_1: 279,2001.5 279,1883 323.5,1883 323.5,2001.5
  rectangle net NetL5_2: 1098,824 1150,860.01
  rectangle net GND: 67,942 85,1044
  region net NetC78_2: 1635.5,972.02 1603.5,972.02 1603.5,844.01 1635.5,844.01
  region net VDD_SNVS: 1757.5,877.01 1650.5,877.01 1650.5,829.01 1757.5,829.01
  region net NetC32_2: 1391.5,796.01 1320.5,796.01 1320.5,761.01 1391.5,761.01
  region net NetL5_2: 1108.5,860.01 991.5,860.01 991.5,793.02 1108.5,793.02
  region net V_RTC: 1960,988 1745,988 1745,887.02 1960,887.02
  region net VDD_SNVS: 1885.5,877.01 1745,877.01 1745,829.01 1885.5,829.01
  region net RST_MCU: 1800.5,1102.01 1724.5,1102.01 1724.5,1028.01 1800.5,1028.01
  region net 3V3: 1841.5,1254.01 1612,1254.01 1612,1144 1841.5,1144
  region net 8V4: 20,988 20,940 59.08,940 59.08,988
  region net GND: 473,896 430,896 430,868 473,868
  region net NetR4_2: 512.5,940.4 485.58,940.4 485.58,866 512.5,866
  region net NetR2_1: 26,923 26,897 314,897 314,923
  region net NetC10_2: 313,969 313,995.27 173,995.27 173,969
  region net NetC11_2: 154,972.85 154,993.27 93.68,993.27 93.68,972.85
  region net GND: 376,1013 376,1044 67,1044 67,1013
  region net NetC2_1: 260,1299 72,1299 72,1058 260,1058
  rectangle net 8V4: 72,1333 540,1464
  region net GND: 451,1214 330,1214 330,868 451,868
  region net NetC2_2: 580,1067 580,1093 465,1093 465,1067
  region net S-: 703,1014 703,1042 464.68,1042 464.68,1014
  region net 3V3: 1953.5,660.01 1815.5,660.01 1815.5,629.01 1953.5,629.01
  pour cut-out: 50,1225 283,1225 283,1445 50,1445
  pour cut-out: 225,1740 474.32,1740 474.32,1503 225,1503
  pour cut-out: 572,4921.26 1971,4921.26 1971,4651 572,4651

## Silkscreen, mask and mechanical layers (free items; w line width, h text height)
Top Overlay:
  lines w5: 584.38,3723.48 603.88,3723.48 603.88,3643
  text "RX1" at 689.75,4724.73 h40 r90
  text "TX1" at 752.63,4724.73 h40 r90
  text "12V" at 9.21,4612.51 h50
  text "5V" at 320.43,4612.51 h50
  text "RX2" at 1772.73,3667.25 h40
  text "TX2" at 1772.73,3604.37 h40
  text "QWIIC" at 1735.88,3309.89 h40 r90
  text "TX0" at 80.73,3230.2 h40
  text "RX0" at 77.46,3167.33 h40
  text "3V3" at 631.92,3040.69 h40 r90
  text "GND" at 730.34,3040.69 h40 r90
  text "3V3" at 1274.13,3032.69 h40 r90
  text "GND" at 1372.55,3032.69 h40 r90
  text "3V" at 512,2984.41 h50
  text "3V" at 1154.21,2976.41 h50
  text "8V4" at 279.92,2847.69 h40 r90
  text "GND" at 378.34,2847.69 h40 r90
  text "5V" at 946.13,2847.69 h40 r90
  text "GND" at 1044.55,2847.69 h40 r90
  text "5V" at 1608.34,2847.69 h40 r90
  text "GND" at 1706.77,2847.69 h40 r90
  text "8V4" at 160,2791.41 h50
  text "5V" at 826.21,2791.51 h50
  text "5V" at 1488.43,2791.51 h50
  text "8V4" at 266.57,2655.39 h50 r270
  text "A10" at 543.26,2545.39 h40 r90
  text "GND" at 643.26,2545.39 h40 r90
  text "5V" at 743.26,2545.39 h40 r90
  text "A11" at 1251.25,2545.39 h40 r90
  text "GND" at 1351.25,2545.39 h40 r90
  text "5V" at 1451.25,2545.39 h40 r90
  text "5V" at 266.57,2495.58 h50 r270
  text "LHS_V" at 420,2484.43 h50
  text "RHS_V" at 1127.99,2484.43 h50
  text "B11" at 543.26,2240.39 h40 r90
  text "GND" at 643.26,2240.39 h40 r90
  text "8V4" at 743.26,2240.39 h40 r90
  text "D9" at 1251.25,2240.39 h40 r90
  text "GND" at 1351.25,2240.39 h40 r90
  text "8V4" at 1451.25,2240.39 h40 r90
  text "5V" at 87.49,2201.82 h50
  text "LHS_T" at 420,2179.43 h50
  text "RHS_T" at 1127.99,2179.43 h50
  text "8V4" at 87.49,2103.87 h50
  text "10V" at 1751,2025 h50
  text "3V3" at 87.49,2005.87 h50
  text "GND" at 1748.99,1924.56 h50
  text "12V" at 87.49,1908.17 h50
  text "G11" at 1768.8,1824.56 h50
  text "S-" at 87.49,1810.25 h50
  text "M11" at 1767.34,1725 h50
  text "GND" at 87.49,1711.82 h50
  text "ESC" at 1841,1663 h40
  text "IN" at 1883,1604 h40
  text "JTAG" at 1708.9,1467.41 h50
  text "8V4" at 898.99,1163.35 h50 r90
  text "RTC" at 1848.91,950.43 h50
  text "GND" at 1848.08,761.41 h50
  text "VBUS" at 1399.95,382.41 h50
  text "M12" at 769.3,339.95 h50 r90
  text "K10" at 869.3,339.95 h50 r90
  text "J12" at 969.3,339.95 h50 r90
  text "L13" at 1069.3,339.95 h50 r90
  text "J13" at 1169.3,339.95 h50 r90
  text "H13" at 1269.3,339.95 h50 r90
  text "5V" at 547.95,150.7 h50
  text "5V" at 1286.95,150.7 h50
  text "GND" at 547.95,50.7 h50
  text "GND" at 1286.95,50.7 h50
Bottom Overlay:
  lines w5: 1280,1029.02 1280,1152 1281,1153 ; 1369.5,1067 1516,1067 1561,1112 ; 1427,1029.02 1427,1044 1436.5,1053.51 1566.49,1053.51
  text "ASCII - v1.2" at 1962.33,4852.24 h70
  text "3V3" at 595.4,3040.69 h40 r270
  text "GND" at 693.82,3040.69 h40 r270
  text "3V3" at 1237.61,3032.69 h40 r270
  text "GND" at 1336.03,3032.69 h40 r270
  text "8V4" at 243.4,2847.69 h40 r270
  text "GND" at 341.82,2847.69 h40 r270
  text "5V" at 909.61,2847.69 h40 r270
  text "GND" at 1008.03,2847.69 h40 r270
  text "5V" at 1571.82,2847.69 h40 r270
  text "GND" at 1670.25,2847.69 h40 r270
  text "A10" at 506.74,2545.39 h40 r270
  text "GND" at 606.74,2545.39 h40 r270
  text "5V" at 706.74,2545.39 h40 r270
  text "A11" at 1214.73,2545.39 h40 r270
  text "GND" at 1314.73,2545.39 h40 r270
  text "5V" at 1414.73,2545.39 h40 r270
  text "B11" at 506.74,2239.8 h40 r270
  text "GND" at 606.74,2239.8 h40 r270
  text "8V4" at 706.74,2239.8 h40 r270
  text "D9" at 1213.82,2240.1 h40 r270
  text "GND" at 1313.82,2240.1 h40 r270
  text "8V4" at 1413.82,2240.1 h40 r270
Board Outline:
  the board outline again, w10

## Dimensions
1968.5,4921.26 to 1968.5,0 on Dimensions
0,4921.26 to 1968.5,4921.26 on Dimensions

## Text inside footprints (layer, text, board x,y; h text height)
J8: Top Overlay "1" at 1292,259 h40; Top Overlay "16" at 638,259.51 h40; Top Overlay "3" at 1228,9 h40; Top Overlay "18" at 713,9 h40
J15: Top Overlay "-" at 1787.53,3937.16 h40 r180; Top Overlay "+" at 1091.23,3933.8 h40 r180
J21: Top Overlay "1" at 1815,3338 h19.68 r90; Mechanical 13 "PCB Edge" at 1934.04,3377.02 h31.5 r90
U6: Top Overlay "MPU6050" at 901,1900 h40; Top Overlay "INT" at 1331,1655 h40 r90; Top Overlay "AD0" at 1231,1655 h40 r90; Top Overlay "XCL" at 1131,1655 h40 r90; Top Overlay "XDA" at 1031,1655 h40 r90; Top Overlay "SDA" at 931,1655 h40 r90; Top Overlay "SCL" at 831,1655 h40 r90; Top Overlay "GND" at 731,1655 h40 r90; Top Overlay "3V3" at 635.69,1655 h40 r90